# Altium PCB PCB1.PcbDoc (part 2 of 2)
Units mm, origin at the board's own origin, x right, y up, seen from the top; angles counter-clockwise.
Board outline 99 x 99 mm, 4 copper layers (TOP, GND, P, BOT), stack 1.591 mm thick; 114 components, 75 nets, 421 pads, 154 vias.
Unrouted connection lines stored in the file: 105.
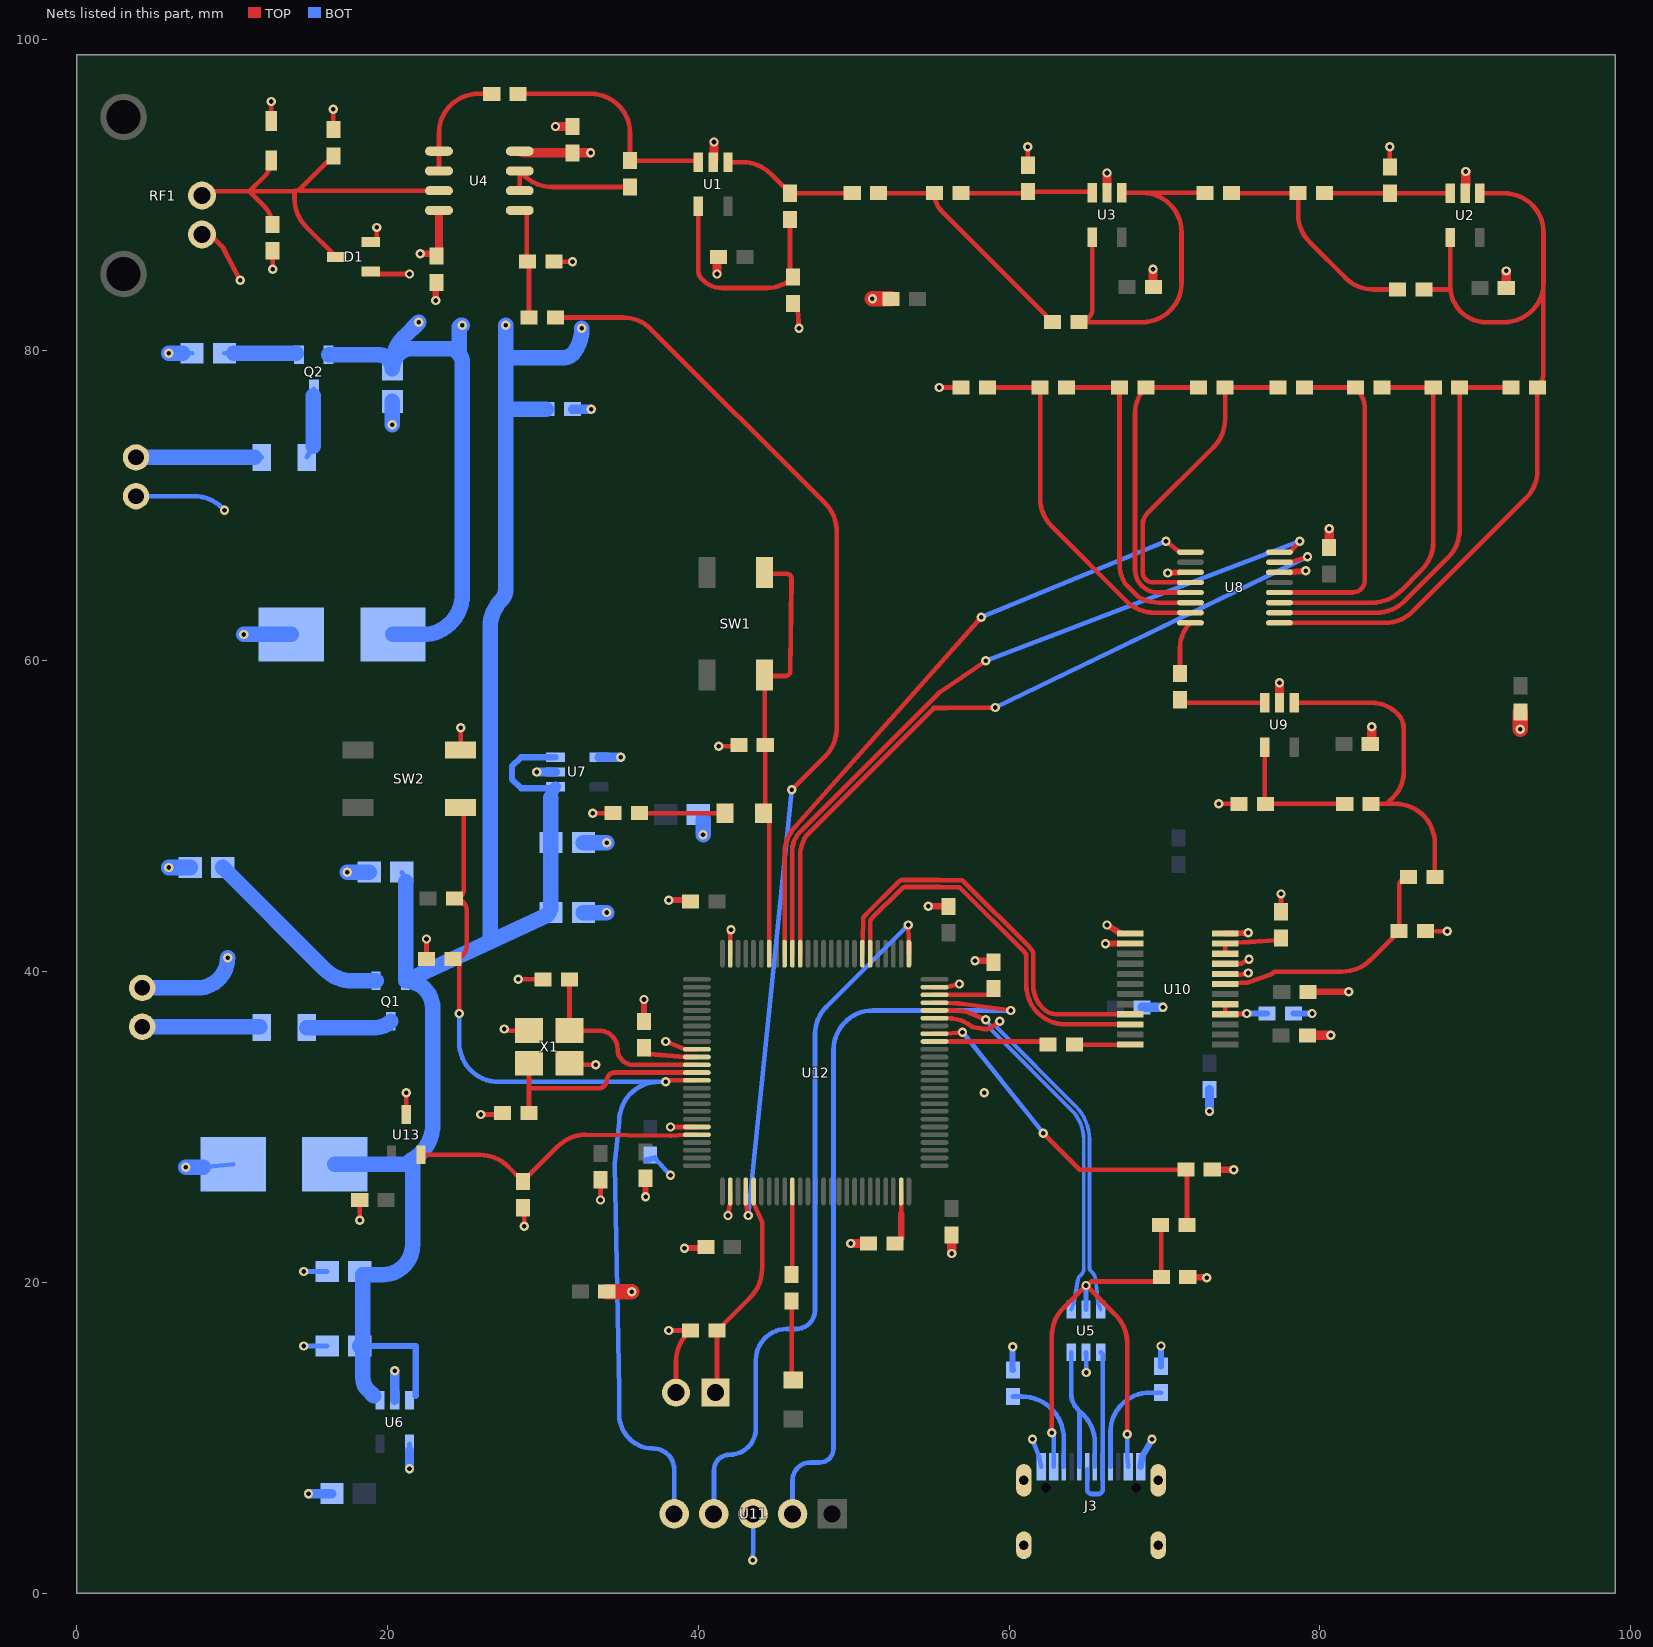
[diagram p4: the nets of this part, all layers, seen from the top]

## Via types
v1: diameter 0.6, hole 0.3, TOP to BOT, tented both sides, 137 vias
v2: diameter 1, hole 0.5, TOP to BOT, tented both sides, 9 vias
v3: diameter 0.6, hole 0.3, TOP to BOT, 8 vias

## Nets (pads, with @x,y where several pads share a name; then routed paths per layer and width w, separated by ;. In a path a pad name is that pad's centre, name@x,y a point inside that pad or via, vN(x,y) a via of type N, cw(c..) or ccw(c..) an arc to the next point about the centre after c; other vN are vias at no path point) (continued)
ADC_D6: U10.9 U12.82 | length 25.7
  TOP w0.3: U12.82@50.55,41.15 50.601,43.232 cw(c53.59,43.16) 50.609,43.394 50.609,43.395 cw(c50.908,43.37) 50.678,43.562 cw(c51.59,42.798) 50.679,43.564 cw(c50.908,43.37) 50.692,43.578 50.81,43.7 cw(c51.35,43.18) 50.818,43.708 ; 50.818,43.709 52.826,45.716 cw(c53.355,45.186) 52.827,45.718 52.923,45.813 cw(c53.134,45.6) 53.134,45.9 53.32,45.9 55.518,45.9 55.538,45.9 55.541,45.9 56.884,45.878 56.886,45.878 cw(c56.879,45.578) 57.09,45.791 57.219,45.663 cw(c56.69,45.131) 57.22,45.661 61.256,41.625 cw(c60.726,41.095) 61.258,41.624 61.28,41.601 cw(c61.068,41.39) 61.3,41.579 61.302,41.577 61.386,41.471 61.49,41.34 cw(c61.255,41.154) 61.555,41.156 ; 61.555,41.155 61.561,38.941 ccw(c61.861,38.942) 61.563,38.91 ccw(c63.64,39.14) 61.563,38.907 ccw(c63.64,39.14) 62.497,37.39 ccw(c62.66,37.642) 62.55,37.363 ccw(c63.15,38.9) 63.15,37.25 U10.9@67.804,37.25
ADC_D7: U10.10 U12.81 | length 25
  TOP w0.3: U12.81@51.05,41.15 51.05,43.16 cw(c53.59,43.16) 51.05,43.183 51.05,43.185 cw(c51.35,43.18) 51.139,43.393 53.108,45.362 cw(c53.32,45.15) 53.32,45.45 55.517,45.45 cw(c55.517,45.15) 55.519,45.45 55.521,45.45 56.695,45.431 56.697,45.431 cw(c56.689,45.131) 56.902,45.343 60.939,41.306 cw(c60.726,41.094) 60.959,41.284 60.961,41.282 61.035,41.189 cw(c60.8,41.002) 61.1,41.005 ; 61.1,41.003 61.1,39.14 ccw(c63.64,39.14) 63.64,36.6 U10.10@67.804,36.6
CLK: R45.2 U10.12 | length 3.6
  TOP w0.3: R45.2@64.2,35.3 U10.12@67.804,35.3
DAC_OUT: R10.2 U12.29 | length 71
  TOP w0.3: R10.2@30.8,82.1 35.148,82.1 cw(c35.148,79.56) 36.944,81.356 48.156,70.144 cw(c46.36,68.348) 48.9,68.348 48.9,55.652 cw(c46.36,55.652) 48.156,53.856 v1(46,51.7) ; U12.29@43.05,25.85 43.05,25.1 v1(43.2,24.3)
  BOT w0.3: v1(43.2,24.3) v1(46,51.7)
function: H1.1 R103.1 U12.30 | length 14.2
  TOP w0.3: H1.1@41.1,12.9 ccw(c40.859,13.141) 41.2,13.141 R103.1@41.2,16.9 43.356,19.056 ccw(c41.56,20.852) 44.1,20.852 44.1,23.9 43.55,25.1 U12.30@43.55,25.85
GND: C1.2 C2.2 C3.2 C4.2 C5.2 C6.1 C7.1 C8.1 C11.2 C12.1 C13.1 C15.2 C17.1 C22.1 C23.1 C25.1 C26.2 C27.2 C28.2 C29.1 C30.1 C31.1 C32.2 C33.1 C35.1 C36.1 C37.1 C38.1 C39.1 C40.1 C41.1 C42.1 C43.1 C44.1 C45.1 C46.2 C47.1 C48.2 C49.1 C106.2 C107.2 C108.1 CP3.1 CP4.1 CP5.1 CP6.1 CP7.2 CP10.1 D2.2 H1.2 J1.2 J2.1 J3.A1_B12 J3.B1_A12 J3.SH1 J3.SH2 J3.SH3 J3.SH4 R1.1 R9.2 R11.2 R13.1 R24.1 R25.1 R26.1 R40.2 R100.1 R102.2 R103.2 R108.2 RF1.2 SW2.3 U1.2 U2.2 U3.2 U5.2 U6.2 U6.4 U7.2 U7.4 U8.3 U8.14 U9.2 U10.1 U10.2 U10.20 U10.21 U10.24 U11.3 U12.10 U12.20 U12.27 U12.74 U12.99 U13.3 X1.2 X1.4 | length 150.8
  TOP w0.3: RF1.2@8.35,87.675 9.331,86.694 ; 9.332,86.693 cw(c9.119,86.482) 9.384,86.622 v1(10.5,84.5) ; D2.2@12.5,94.75 12.5,95.25 v1(12.5,96) ; v1(12.6,85.2) C8.1@12.6,86.2 ; R100.1@16.5,94.2 v1(16.5,95.5) ; v1(18.2,24) C44.1@18.2,25.3 ; U13.3@21.2,30.8 v1(21.2,32.2) ; C39.1@22.5,40.8 v1(22.5,42.1) ; C11.2@23.1,83.95 C11.2@23.15,84.35 ; SW2.3@24.65,54.275 ccw(c24.65,54.325) 24.7,54.325 v1(24.7,55.7) ; v1(26,30.8) 27,30.8 C36.1@27.4,30.9 ; v1(27.5,36.3) ccw(c27.6,36.3) 27.6,36.2 X1.2@29.1,36.2 ; v1(28.4,39.5) C37.1@30,39.5 ; C41.1@28.7,24.8 cw(c28.459,24.559) 28.8,24.559 v1(28.8,23.6) ; C13.1@30.7,85.7 v1(31.9,85.7) ; C6.1@31.6,94.4 C6.1@31.9,94.4 ; X1.4@31.7,34.1 ccw(c31.8,34.1) 31.8,34 v1(33.4,34) ; v1(33.2,50.2) R102.2@34.5,50.2 ; v1(33.7,25.3) C43.1@33.7,26.6 ; v1(37.9,35.5) 39.15,35 U12.10@39.9,35 ; v1(38.1,16.9) R103.2@39.5,16.9 39.304,16.704 ccw(c41.1,14.908) 38.56,14.908 H1.2@38.56,12.9 ; v1(38.2,30) U12.20@39.9,30 ; C35.1@39.1,44.6 C35.1@39.5,44.5 ; U1.2@40.95,92.1 ccw(c40.83,92.22) U1.2@41,92.22 ; C1.2@41.2,85.759 cw(c41.541,85.759) C1.2@41.3,86 ; v1(41.3,54.5) 42.2,54.5 R40.2@42.6,54.6 ; v1(41.9,24.3) 42.05,25.1 U12.27@42.05,25.85 ; U12.99@42.05,41.15 v1@42.05,42.508 ; R1.1@46.1,83 46.4,82.6 v1(46.475,81.4) ; U12.74@55.2,39 55.95,39 v1(56.8,39.2) ; v1(55.5,77.6) R24.1@56.9,77.6 ; C46.2@58.7,40.7 C46.2@59,40.6 ; C7.1@61.2,91.9 v1(61.2,93.1) ; U3.2@66.3,90.125 U3.2@66.3,90.6 ; U10.2@67.104,41.8 U10.2@67.804,41.8 U10.2@67.551,41.85 ; C4.2@69.262,84.35 C4.2@69.287,84.05 ; U8.3@70.974,65.7 U8.3@71.668,65.7 ; v1(73.5,50.8) R25.1@74.8,50.8 ; U10.20@73.9,39.85 74.6,39.8 74.847,39.8 ccw(c74.847,40.1) 74.911,39.807 v1(75.397,39.913) ; U10.21@73.9,40.5 74.805,40.5 ccw(c74.804,40.9) 75.003,40.553 v1(75.437,40.8) ; U8.14@77.4,65.7 U8.14@78.094,65.7 ; v1(77.5,45) 77.5,44.25 77.698,44.019 C33.1@77.8,43.9 ; C26.2@83.241,54.659 ccw(c83,54.9) C26.2@83.341,54.9 ; C5.2@84.5,91.8 v1(84.5,93.1) ; 87.5,42.6 v1(88.2,42.6) ; U2.2@89.365,90.274 U2.2@89.4,90.575
  TOP w0.4: v1(23.1,83.2) C11.2@23.1,83.95 ; C38.1@36.5,36.8 v1(36.5,38.2) ; v1(36.6,25.5) C42.1@36.6,26.7 ; v1(38.1,44.6) C35.1@39.1,44.6 ; v1(39.1,22.2) 40.129,22.2 C47.1@40.479,22.279 ; v1@42.05,42.508 cw(c42.45,42.506) v1(42.1,42.7) ; v1(54.8,44.2) C45.1@56.1,44.2 ; v1(57.8,40.7) C46.2@58.7,40.7 ; v1(66.2,41.8) U10.2@67.104,41.8 ; v1(66.3,43) U10.1@67.104,42.498 ; v1(70.209,65.658) U8.3@70.974,65.7 ; C12.1@71.5,20.35 71.525,20.325 72.7,20.325 v3(72.725,20.3) ; R13.1@73.075,27.25 v3(74.45,27.25) ; U10.24@73.9,42.45 74.55,42.45 v1(75.4,42.5) ; U8.14@78.094,65.7 v1(79.1,65.8) ; C31.1@79.25,38.7 79.6,38.7 v1(81.85,38.7)
  TOP w0.6: v1(30.8,94.4) C6.1@31.6,94.4 ; U1.2@41,92.22 v1(41,93.4) ; v1(41.2,84.9) C1.2@41.2,85.759 ; v1(49.8,22.5) C48.2@50.95,22.5 ; v1(56.3,21.85) C49.1@56.3,23.05 ; U3.2@66.3,90.6 v1(66.3,91.4) ; C4.2@69.262,84.35 v1(69.262,85.2) ; U9.2@77.4,57.3 v1(77.4,58.6) ; C28.2@79.2,35.9 v1(80.7,35.9) ; C25.1@80.6,67.5 v1(80.6,68.5) ; C26.2@83.341,54.9 v1(83.341,55.759) ; U2.2@89.4,90.575 v1(89.4,91.5) ; C3.2@92,84 v1(92,85.1)
  TOP w1: C108.1@34.1,19.4 v1(35.7,19.4) ; v1(51.2,83.3) C2.2@52.4,83.3 ; v1(92.9,55.6) C107.2@92.9,56.7
  BOT w0.3: J2.1@3.8,70.6 7.548,70.6 cw(c7.548,68.06) 9.344,69.856 v1(9.5,69.7) ; R26.1@6.81,79.787 R26.1@7.41,79.8 ; C15.2@8.116,27.4 C15.2@10.066,27.6 ; v1(14.6,15.9) CP4.1@16.11,15.9 ; v1(14.6,20.7) CP3.1@16.11,20.7 ; U6.4@21.4,9.15 U6.4@21.4,9.6 ; C40.1@37.2,28 v1(38.2,26.9) ; CP10.1@39.99,50.1 cw(c39.99,49.79) CP10.1@40.3,49.79 ; v1(43.5,2.1) 43.52,2.993 ccw(c43.22,3) 43.52,3 U11.3@43.52,5.1 ; v3(61.5,9.9) 61.92,8.795 J3.B1_A12@62.07,8.13 ; U5.2@64.95,15.5 64.96,15.075 v1(64.96,14.2)
  BOT w0.4: C40.1@36.65,27.85 36.972,27.938 C40.1@37.2,28 ; v1(60.225,15.85) 60.225,14.41 ccw(c60.31,14.41) R11.2@60.25,14.35 ; J3.A1_B12@68.47,8.13 68.57,8.805 v3(69.2,9.9) ; R108.2@69.775,14.6 v3(69.775,15.9) ; C30.1@78.3,37.3 v1(79.5,37.3)
  BOT w0.6: v1(14.9,6.4) CP5.1@16.41,6.4 ; U6.2@20.45,12.4 v1(20.45,14.3) ; v1(21.4,8) U6.4@21.4,9.15 ; v1(29.6,52.85) U7.2@30.8,52.85 ; C106.2@31.9,76.2 v1(33.1,76.2) ; U7.4@33.6,53.8 v1@35,53.8 ; C29.1@68.55,37.7 v1(69.9,37.7) ; v1(72.9,31) C27.2@72.9,32.4
  BOT w1: J1.2@4.2,38.95 7.75,38.95 ccw(c7.75,40.9) v1(9.7,40.9) ; v1(5.9,46.7) R9.2@7.3,46.7 ; v1(5.9,79.8) R26.1@6.81,79.787 ; v1(7,27.4) C15.2@8.116,27.4 ; v1(10.734,61.7) C17.1@13.8,61.7 ; v1(17.4,46.4) CP6.1@18.81,46.4 ; v1(20.3,75.2) CP7.2@20.3,76.7 ; C23.1@32.6,43.8 v1(34.1,43.8) ; C22.1@32.6,48.3 v1(34.1,48.3) ; v1(40.3,48.8) CP10.1@40.3,49.79
  other v1: 58.4,32.2 35,53.8
MUX_A0: U8.1 U12.92 | length 41.1
  TOP w0.3: U12.92@45.55,41.15 45.55,47.598 cw(c48.09,47.598) 46.288,49.388 46.289,49.389 ccw(c46.075,49.6) 46.299,49.399 v1(58.2,62.8) ; v1(70.1,67.7) 70.974,67 U8.1@71.668,67
  BOT w0.3: v1(58.2,62.8) v1(70.1,67.7)
MUX_A1: U8.16 U12.91 | length 47.5
  TOP w0.3: U12.91@46.05,41.15 46.05,47.998 cw(c48.59,47.998) 46.05,48.022 cw(c46.35,48.018) 46.058,48.087 cw(c48.09,47.598) 46.613,49.077 55.428,57.892 cw(c55.64,57.679) 55.471,57.927 v1(58.5,60) ; U8.16@77.4,67 78.094,67 v1(78.7,67.7)
  BOT w0.3: v1(58.5,60) v1(78.7,67.7)
MUX_A2: U8.15 U12.90 | length 47.4
  TOP w0.3: U12.90@46.55,41.15 46.55,47.398 cw(c49.09,47.398) 46.953,48.771 cw(c47.205,48.608) 46.992,48.819 55.136,56.964 56.01,56.964 ccw(c56.01,57.264) 56.014,56.964 v1(59.1,57) ; U8.15@77.4,66.35 78.094,66.35 v1(79.2,66.7)
  BOT w0.3: v1(59.1,57) v1(79.2,66.7)
NetC5_1: C5.1 R5.1 U2.3 | length 8.1
  TOP w0.3: R5.1@80.3,90.1 C5.1@84.5,90.1 U2.3@88.4,90.1
NetC7_2: C7.2 R7.1 U3.3 | length 8.5
  TOP w0.3: R7.1@56.9,90.1 60.959,90.1 ccw(c60.959,90.441) C7.2@61.2,90.2 65.169,90.2 cw(c65.169,89.944) U3.3@65.35,90.125
NetC8_2: C8.2 D1.3 D2.1 R100.2 RF1.1 U4.3 | length 29
  TOP w0.2: RF1.1@8.35,90.175 RF1.1@8.395,90.22
  TOP w0.3: RF1.1@8.395,90.22 11.1,90.22 ; D2.1@12.5,92.2 cw(c11.1,92.2) 12.09,91.21 11.1,90.22 ; C8.2@12.6,87.9 ccw(c10.62,87.9) 12.02,89.3 11.1,90.22 ; 14.376,90.265 U4.3@23.7,90.265 ; R100.2@16.5,92.5 14.376,90.376 cw(c14.109,90.642) 14.109,90.265 ccw(c14.109,90.111) 14,90.22 ; D1.3@16.7,86 14.744,87.956 cw(c16.54,89.752) 14,89.752 14,90.22 ; 11.1,90.22 14,90.22
NetC9_1: C9.1 R17.2 U2.1 U2.4 U8.9 | length 55.5
  TOP w0.3: U8.9@77.4,62.45 84.198,62.45 ccw(c84.198,64.99) 85.994,63.194 93.256,70.456 ccw(c91.46,72.252) 94,72.252 R17.2@94,77.6 ccw(c93.062,78.538) 94.389,78.538 94.389,84.1 ; C9.1@86.7,83.9 88.24,83.9 cw(c88.24,83.706) 88.434,83.706 ; U2.4@88.4,87.25 88.4,84.1 ccw(c90.7,84.1) 90.7,81.8 91.86,81.8 ccw(c91.86,84.34) 94.4,84.34 94.4,87.56 ccw(c91.86,87.56) 91.86,90.1 U2.1@90.3,90.1
NetC9_2: C9.2 R4.1 R5.2 | length 14.5
  TOP w0.3: R4.1@74.3,90.1 R5.2@78.6,90.1 78.6,88.752 ccw(c81.14,88.752) 79.344,86.956 81.656,84.644 ccw(c83.452,86.44) 83.452,83.9 C9.2@85,83.9
NetC10_1: C10.1 R4.2 U3.1 U3.4 | length 26.6
  TOP w0.3: U3.4@65.35,87.275 65.35,82.65 cw(c64.5,82.65) C10.1@64.5,81.8 68.56,81.8 ccw(c68.56,84.34) 71.1,84.34 71.1,87.585 ccw(c68.56,87.585) 68.56,90.125 ; U3.1@67.25,90.125 72.54,90.125 cw(c72.54,90.04) R4.2@72.6,90.1
NetC10_2: C10.2 R6.1 R7.2 | length 15
  TOP w0.3: R6.1@51.6,90.1 R7.2@55.2,90.1 ccw(c56.89,90.1) 55.695,88.905 C10.2@62.8,81.8
NetC12_2: C12.2 J3.A4_B9 J3.B4_A9 R12.1 U5.5 | length 35.1
  TOP w0.3: v3(62.75,10.325) 62.75,16.548 cw(c65.29,16.548) 63.494,18.344 v3(64.95,19.8) ; v3(67.6,10.225) 67.6,16.098 ccw(c65.06,16.098) 66.856,17.894 v3(64.95,19.8) ; R12.1@69.75,23.675 69.8,23.625 C12.2@69.8,20.35 69.5,20.05 65.281,20.05 65.031,19.8 v3(64.95,19.8)
  BOT w0.3: v3(62.75,10.325) 62.777,10.298 cw(c62.566,10.085) 62.866,10.086 62.868,8.855 J3.B4_A9@62.87,8.13 ; U5.5@64.95,18.25 v3(64.95,19.8) ; v3(67.6,10.225) 67.6,8.855 J3.A4_B9@67.67,8.13
NetC13_2: C13.2 R10.1 U4.5 | length 7.4
  TOP w0.3: U4.5@28.5,88.995 28.954,88.995 28.954,86 C13.2@29,85.7 29.092,85.4 29.092,82.4 R10.1@29.1,82.1
NetC30_2: C30.2 U10.16 U10.17 | length 3.4
  TOP w0.3: U10.17@73.9,37.9 U10.16@73.9,37.25 73.925,37.275 75.275,37.275 v1(75.3,37.3)
  BOT w0.4: v1(75.3,37.3) C30.2@76.6,37.3
NetC32_1: C32.1 R37.2 U10.19 | length 16.2
  TOP w0.3: U10.19@73.9,39.2 74.6,39.25 74.836,39.284 cw(c74.879,38.987) 74.879,39.287 75.309,39.287 ccw(c75.309,39.587) 75.409,39.305 76.8,39.8 ccw(c76.698,40.082) 76.893,39.854 cw(c77.41,39.253) 77.077,39.973 cw(c77.202,39.7) 77.202,40 81.448,40 ccw(c81.448,42.54) 83.244,40.744 C32.1@85.1,42.6 85.1,45.5 cw(c85.7,45.5) R37.2@85.7,46.1
NetC33_2: C33.2 U10.22 U10.23 | length 4.3
  TOP w0.3: U10.22@73.9,41.15 U10.23@73.9,41.8 74.6,41.85 75.437,41.901 ccw(c75.4,42.5) 75.441,41.901 77.2,42.022 C33.2@77.556,42.046
NetC36_2: C36.2 U12.13 X1.3 | length 14.6
  TOP w0.3: C36.2@29.1,30.9 X1.3@29.1,34.1 ; 29.1,32.5 33.6,32.5 ccw(c33.6,33) 34.1,33 cw(c34.6,33) 34.6,33.5 U12.13@39.9,33.5
NetC37_2: C37.2 U12.12 X1.1 | length 12.8
  TOP w0.3: C37.2@31.7,39.5 X1.1@31.7,36.2 33.6,36.2 cw(c33.6,35) 34.8,35 ccw(c35.8,35) 35.8,34 U12.12@39.9,34
NetC38_2: C38.2 U12.11 | length 3.6
  TOP w0.3: C38.2@36.5,35.1 36.8,34.7 39.15,34.5 U12.11@39.9,34.5
NetC41_2: C41.2 U12.21 U13.2 | length 19.5
  TOP w0.3: U13.2@22.15,28.2 25.948,28.2 cw(c25.948,25.66) 27.744,27.456 C41.2@28.7,26.5 30.956,28.756 cw(c32.752,26.96) 32.752,29.5 cw(c32.752,29.2) 32.756,29.5 38.192,29.423 ccw(c38.2,30) 38.248,29.425 39.15,29.5 U12.21@39.9,29.5
NetC46_1: C46.1 U12.73 | length 3.5
  TOP w0.3: U12.73@55.2,38.5 55.95,38.5 C46.1@58.7,38.5
NetC48_1: C48.1 U12.49 | length 3.6
  TOP w0.3: C48.1@52.65,22.5 C48.1@53.05,22.8 ; 53.05,24.4 53.05,25.1 U12.49@53.05,25.85
  TOP w0.4: C48.1@53.05,22.8 53.05,24.4
NetD3_1: D3.1 R46.2 | length 5.1
  TOP w0.3: R46.2@46,18.8 46,13.941 ccw(c46.341,13.941) D3.1@46.1,13.7
NetD4_1: D4.1 R102.1 | length 5.5
  TOP w0.3: R102.1@36.2,50.2 D4.1@41.7,50.2
NetD4_2: D4.2 R40.1 SW1.1 SW1.2 U12.94 | length 27.8
  TOP w0.3: SW1.1@44.275,65.65 44.625,65.6 45.695,65.6 cw(c45.695,65.3) 45.995,65.295 45.905,59.324 ; U12.94@44.55,41.15 44.55,49.725 D4.2@44.2,50.2 44.293,50.675 44.293,54.3 R40.1@44.3,54.6 44.278,54.9 44.278,58.55 44.275,59.15 44.625,59.029 45.605,59.029 ccw(c45.605,59.329) 45.905,59.323
NetF1_1: F1.1 J1.1 | length 7.7
  BOT w0.3: F1.1@11.779,36.45 cw(c11.779,36.279) F1.1@11.9,36.4
  BOT w1: J1.1@4.2,36.45 F1.1@11.779,36.45
NetF1_2: F1.2 Q1.3 | length 5.5
  BOT w1: F1.2@14.79,36.4 19.234,36.4 ccw(c19.234,37.766) Q1.3@20.2,36.8
NetF2_1: F2.1 J2.2 | length 8.1
  BOT w0.3: F2.1@11.455,73.1 F2.1@11.9,73.1
  BOT w1: J2.2@3.8,73.1 F2.1@11.455,73.1
NetF2_2: F2.2 Q2.3 | length 4.5
  BOT w0.3: F2.2@14.79,73.1 F2.2@15.203,73.814 ; Q2.3@15.203,77.05 Q2.3@15.25,77.5
  BOT w1: F2.2@15.203,73.814 Q2.3@15.203,77.05
NetJ3_A5: J3.A5 R108.1 | length 6.9
  BOT w0.3: J3.A5@66.52,8.13 66.52,10.355 cw(c69.065,10.355) 69.065,12.9 R108.1@69.775,12.9
NetJ3_A6: J3.A6 J3.B6 U5.3 | length 11.3
  BOT w0.3: U5.3@64,15.5 64,12.815 ccw(c65.365,12.815) 64.4,11.85 cw(c64.098,11.548) 64.525,11.548 J3.B6@64.525,8.136 ; 64.606,11.628 cw(c62.994,9.684) 65.52,9.684 J3.A6@65.52,8.13
NetJ3_A7: J3.A7 J3.B7 U5.1 | length 11.5
  BOT w0.3: J3.A7@65.025,7.975 65.025,6.675 ccw(c65.325,6.675) 65.325,6.375 65.725,6.375 ccw(c65.725,6.675) 66.025,6.675 66.025,15.375 U5.1@65.9,15.5
NetJ3_B5: J3.B5 R11.1 | length 6.6
  BOT w0.3: R11.1@60.25,12.65 60.81,12.65 cw(c60.81,9.94) 63.52,9.94 J3.B5@63.52,8.13
NetQ1_1: Q1.1 R9.1 | length 12.8
  BOT w1: R9.1@9.39,46.7 15.946,40.144 ccw(c17.742,41.94) 17.742,39.4 Q1.1@19.25,39.4
NetQ2_1: Q2.1 R26.2 | length 4.8
  BOT w0.3: R26.2@9.5,79.8 R26.2@10.1,79.787 ; Q2.1@14.125,79.787 Q2.1@14.3,79.7
  BOT w1: R26.2@10.1,79.787 Q2.1@14.125,79.787
NetR1_2: R1.2 R2.1 U1.4 | length 14.7
  TOP w0.3: U1.4@40,89.25 40,85.083 ccw(c40.683,85.083) 40.2,84.6 40.305,84.495 ccw(c41.5,85.69) 41.5,84 44.41,84 ccw(c44.41,86.39) R1.2@46.1,84.7 cw(c46.583,85.183) 45.9,85.183 R2.1@45.9,88.4
NetR2_2: R2.2 R6.2 U1.1 | length 8.7
  TOP w0.3: U1.1@41.9,92.1 42.848,92.1 cw(c42.848,89.56) 44.644,91.356 R2.2@45.9,90.1 R6.2@49.9,90.1
NetR3_1: R3.1 U4.1 U4.2 | length 7.3
  TOP w0.3: U4.2@23.3,91.535 U4.1@23.3,92.805 23.3,93.96 cw(c25.84,93.96) 25.84,96.5 R3.1@26.7,96.5
NetR3_2: R3.2 R8.2 U1.3 | length 14.8
  TOP w0.3: R3.2@28.4,96.5 33.06,96.5 cw(c33.06,93.96) 35.6,93.96 R8.2@35.6,92.2 39.759,92.2 cw(c39.759,91.859) U1.3@40,92.1
NetR8_1: R8.1 U4.6 U4.7 | length 8.7
  TOP w0.3: U4.6@28.5,90.265 U4.7@28.5,91.535 28.791,91.244 ccw(c30.587,93.04) 30.587,90.5 R8.1@35.6,90.5
NetR17_1: R17.1 R18.2 U8.10 | length 26.7
  TOP w0.3: U8.10@77.4,63.1 83.648,63.1 ccw(c83.648,65.64) 85.444,63.844 88.256,66.656 ccw(c86.46,68.452) 89,68.452 R18.2@89,77.6 R17.1@92.3,77.6
NetR18_1: R18.1 R19.2 U8.11 | length 25.4
  TOP w0.3: U8.11@77.4,63.75 83.398,63.75 ccw(c83.398,66.29) 85.194,64.494 86.556,65.856 ccw(c84.76,67.652) 87.3,67.652 R18.1@87.3,77.6 R19.2@84,77.6 R19.2@83.8,77.6
NetR19_1: R19.1 R20.2 U8.12 | length 21.8
  TOP w0.3: U8.12@77.4,64.4 82.1,64.4 ccw(c82.1,65.2) 82.9,65.2 82.9,76.151 ccw(c80.851,76.151) R19.1@82.3,77.6 R20.2@79,77.6
NetR20_1: R20.1 R21.2 U8.4 | length 20.8
  TOP w0.3: U8.4@71.668,65.05 69.25,65.05 cw(c69.25,65.7) 68.754,65.28 cw(c69.25,65.7) 68.752,65.282 cw(c68.983,65.474) 68.737,65.302 cw(c69.6,65.9) 68.735,65.305 cw(c68.983,65.474) 68.722,65.325 68.659,65.435 cw(c68.92,65.584) 68.648,65.456 cw(c69.6,65.9) 68.647,65.46 cw(c68.92,65.584) 68.637,65.483 68.637,65.485 cw(c69.25,65.7) 68.6,65.7 68.6,68.776 cw(c69.624,68.776) 68.9,69.5 73.156,73.756 ccw(c71.36,75.552) 73.9,75.552 R21.2@73.9,77.6 R20.1@77.3,77.6
NetR21_1: R21.1 R22.2 U8.5 | length 19.7
  TOP w0.3: U8.5@71.668,64.4 69.6,64.4 cw(c69.6,65.9) 68.1,65.9 68.1,75.91 cw(c70.49,75.91) R22.2@68.8,77.6 R21.1@72.2,77.6
NetR22_1: R22.1 R23.2 U8.6 | length 20.7
  TOP w0.3: R23.2@63.7,77.6 R22.1@67.1,77.6 67.1,66.29 ccw(c69.64,66.29) 67.455,64.995 ccw(c67.713,65.147) 67.457,64.992 ccw(c67.713,65.147) 67.5,64.937 68.287,64.15 ccw(c68.498,64.363) 68.343,64.106 ccw(c68.498,64.363) 68.345,64.105 ccw(c69.64,66.29) 69.64,63.75 U8.6@71.668,63.75
NetR23_1: R23.1 R24.2 U8.7 | length 23.7
  TOP w0.3: R24.2@58.6,77.6 R23.1@62,77.6 62,70.452 ccw(c64.54,70.452) 62.744,68.656 67.556,63.844 ccw(c69.352,65.64) 69.352,63.1 U8.7@71.668,63.1
NetR25_2: R25.2 R101.1 U9.4 | length 8.7
  TOP w0.3: U9.4@76.45,54.45 76.45,50.921 ccw(c76.742,51.214) 76.742,50.8 R101.1@81.6,50.8
NetR27_1: R27.1 U9.3 | length 5.5
  TOP w0.3: R27.1@71,57.5 ccw(c71.483,57.983) 71.483,57.3 U9.3@76.45,57.3
NetR27_2: R27.2 U8.8 | length 3.4
  TOP w0.3: R27.2@71,59.2 71,60.836 cw(c73.282,60.836) U8.8@71.668,62.45
NetR37_1: R37.1 R101.2 U9.1 | length 20.7
  TOP w0.3: U9.1@78.35,57.3 83.31,57.3 cw(c83.31,54.91) 85,56.6 cw(c84.034,55.634) 85.4,55.634 85.4,52.8 cw(c83.227,52.8) 84.764,51.264 84.4,50.9 ; R101.2@83.3,50.8 84.86,50.8 cw(c84.86,48.26) 87.4,48.26 R37.1@87.4,46.1
NetR45_1: R45.1 U12.67 | length 7.3
  TOP w0.3: U12.67@55.2,35.5 62.1,35.5 R45.1@62.5,35.3
NetR46_1: R46.1 U12.35 | length 5.4
  TOP w0.3: R46.1@46,20.5 ccw(c45.88,20.62) 46.05,20.62 U12.35@46.05,25.85
NRST: C39.2 R41.2 SW2.1 U11.5 U12.14 | length 64.9
  TOP w0.3: v1(24.6,37.3) 24.6,40.4 ccw(c24.2,40.4) C39.2@24.2,40.8 ccw(c24.2,41.7) 25.1,41.7 25.1,43.9 ccw(c24.3,43.9) R41.2@24.3,44.7 ccw(c24.3,45.3) 24.9,45.3 24.9,49.1 24.9,50.275 ccw(c24.65,50.275) SW2.1@24.65,50.525 ; v1(37.9,32.9) cw(c38,32.9) 38,33 U12.14@39.9,33
  BOT w0.3: v1(24.6,37.3) 24.6,35.44 ccw(c27.14,35.44) 27.14,32.9 37.44,32.9 ; v1(37.9,32.9) 37.44,32.9 ; U11.5@38.44,5.1 38.44,7.96 ccw(c37.1,7.96) 37.1,9.3 cw(c37.1,11.5) 34.9,11.5 34.9,13.006 34.623,27.589 cw(c35.2,27.6) 34.626,27.659 34.898,30.33 ccw(c34.6,30.36) 34.9,30.36 cw(c37.44,30.36) 37.44,32.9
SWCLK: U11.4 U12.76 | length 46.1
  TOP w0.3: v1(53.5,43) 53.55,41.9 U12.76@53.55,41.15
  BOT w0.3: U11.4@40.98,5.1 ccw(c40.98,5.12) 41,5.12 41,7.9 cw(c42,7.9) 42,8.9 ccw(c42,10.6) 43.7,10.6 43.7,15 cw(c45.7,15) 45.7,17 46.3,17 ccw(c46.3,18.2) 47.5,18.2 47.5,35.948 cw(c50.04,35.948) 48.244,37.744 v1(53.5,43)
SWDIO: U11.2 U12.72 | length 49.4
  TOP w0.3: U12.72@55.2,38 55.95,38 56.76,37.942 cw(c56.548,34.96) 56.946,37.923 v1(60.1,37.5)
  BOT w0.3: U11.2@46.06,5.1 46.06,7.26 cw(c47.2,7.26) 47.2,8.4 47.8,8.4 ccw(c47.8,9.3) 48.7,9.3 48.7,34.96 cw(c51.24,34.96) 51.24,37.5 v1(60.1,37.5)
USB_DM: U5.6 U12.70 | length 25.6
  TOP w0.3: U12.70@55.2,37 56.048,37 cw(c56.048,34.46) 57.591,36.478 ccw(c57.774,36.716) 57.593,36.476 ccw(c57.774,36.716) 57.725,36.42 58.403,36.308 ccw(c58.5,36.9) 58.845,36.409 v1(59.4,36.8)
  BOT w0.24: v1(59.4,36.8) 59.223,36.623 ccw(c59.336,36.51) 59.176,36.51 ccw(c59.336,36.51) 59.223,36.397 64.281,31.339 cw(c62.226,29.282) 64.286,31.334 cw(c62.145,29.2) 65.167,29.2 65.167,20.92 ccw(c65.408,20.921) 65.255,20.735 ; 65.256,20.735 cw(c64.715,20.07) 65.567,20.16 ; 65.567,20.158 65.72,18.705 U5.6@65.9,18.25
USB_DP: U5.4 U12.71 | length 24.7
  TOP w0.3: U12.71@55.2,37.5 56.548,37.5 cw(c56.548,34.96) 57.644,37.251 cw(c56.548,34.96) 57.646,37.25 ccw(c57.774,37.522) 57.66,37.244 v1(58.5,36.9)
  BOT w0.24: v1(58.5,36.9) ccw(c58.631,36.9) 58.538,36.807 58.722,36.624 cw(c58.512,36.414) 58.808,36.414 ccw(c59.105,36.414) 58.895,36.205 64.022,31.078 cw(c62.145,29.2) 64.8,29.2 64.8,20.8 cw(c64.56,20.802) 64.793,20.743 cw(c64.56,20.802) 64.778,20.701 cw(c64.011,21.055) 64.563,20.415 ; U5.4@64,18.25 64.18,18.705 64.438,20.196 cw(c64.802,20.134) 64.562,20.415
VBAT+: C6.2 C15.1 C22.2 C23.2 C106.1 CP3.2 CP4.2 CP6.2 D1.2 Q1.2 U4.8 U6.1 U6.3 U7.1 U7.3 | length 129.4
  TOP w0.3: D1.2@19.2,86.95 19.3,87.125 v1(19.3,87.9)
  TOP w0.6: U4.8@28.5,92.805 ccw(c28.839,93.3) 28.837,92.7 v1(33.06,92.7)
  BOT w0.3: CP6.2@20.9,46.4 cw(c20.297,45.797) CP6.2@21.15,45.797
  BOT w0.4: CP4.2@18.2,15.9 21.8,15.9 21.8,12.7 ; U7.1@30.8,51.9 30.7,51.8 28.586,51.8 28,52.386 28,53.214 28.586,53.8 U7.3@30.8,53.8
  BOT w0.7: 30.51,51.2 U7.1@30.8,51.9
  BOT w1: C15.1@16.6,27.6 21.6,27.6 21.6,22.4 cw(c19.7,22.4) 19.7,20.5 18.4,20.5 CP4.2@18.4,15.9 ; CP4.2@18.2,15.9 CP4.2@18.4,15.9 ; 19.1,12.7 18.692,13.108 cw(c19.4,13.814) 18.4,13.814 CP4.2@18.4,15.9 ; CP6.2@21.15,45.797 Q1.2@21.15,39.4 ; 21.474,27.857 ccw(c20.36,30.14) 22.9,30.14 22.9,37.65 ccw(c21.15,37.65) Q1.2@21.15,39.4 ; v1(27.6,81.6) 27.6,79.5 ; C106.1@30.2,76.2 27.6,76.2 ; 30.51,51.2 C22.2@30.51,48.3 30.51,44.229 cw(c29.656,44.229) 30.26,43.625 26.589,41.923 ; v1(32.5,81.4) cw(c29.813,81.4) 32.084,79.965 cw(c31.24,80.5) 31.242,79.5 27.6,79.5 ; Q1.2@21.15,39.4 26.589,41.923 ; 26.589,41.923 26.589,62.137 cw(c29.129,62.137) 27.315,63.914 27.316,63.916 ccw(c26.6,64.614) 27.6,64.612 27.6,76.2 ; 27.6,76.2 27.6,79.5
VBAT-: C11.1 C17.2 CP7.1 D1.1 Q2.2 U4.4 | length 42.9
  TOP w0.3: D1.1@18.9,85.05 19.35,84.9 v1(21.4,84.9) ; C11.1@23.15,86.05 C11.1@23.3,86.45
  TOP w0.4: v1(22.1,86.2) C11.1@22.85,86.2
  TOP w0.5: C11.1@23.3,86.45 U4.4@23.3,88.995
  BOT w1: Q2.2@16.2,79.7 19.39,79.7 cw(c19.39,78.79) CP7.1@20.3,78.79 cw(c21.61,78.79) 21.61,80.1 23.9,80.1 cw(c23.9,79.2) 24.8,79.2 24.8,64.24 cw(c22.26,64.24) 22.26,61.7 C17.2@20.334,61.7 ; CP7.1@20.3,79.048 cw(c22.84,79.048) 21.044,80.844 v1(22,81.8) ; 24.6,79.7 24.6,81.4 cw(c24.8,81.4) v1(24.8,81.6)
VBUS_SENSE: R12.2 R13.2 U12.68 | length 23.9
  TOP w0.3: U12.68@55.2,36 55.95,36 v1(57,36.1) ; v1(62.2,29.6) 64.55,27.25 R13.2@71.375,27.25 71.45,27.175 R12.2@71.45,23.675
  BOT w0.3: v1(57,36.1) v1(62.2,29.6)
pads on no net: J3. J3.A8 J3.B8 RF1.3 RF1.4 SW2.2 SW2.4 U12.1 U12.2 U12.3 U12.4 U12.5 U12.7 U12.8 U12.9 U12.15 U12.16 U12.17 U12.18 U12.23 U12.24 U12.25 U12.26 U12.31 U12.32 U12.33 U12.34 U12.36 U12.37 U12.38 U12.39 U12.40 U12.41 U12.42 U12.43 U12.44 U12.45 U12.46 U12.47 U12.48 U12.51 U12.52 U12.53 U12.54 U12.55 U12.56 U12.57 U12.58 U12.59 U12.60 U12.61 U12.62 U12.63 U12.64 U12.65 U12.66 U12.69 U12.77 U12.78 U12.79 U12.80 U12.89 U12.93 U12.95 U12.96 U12.97 U12.98

## Polygon pours and split planes (outlines as drawn)
3V3D on P "3V3D_L03_P023" (solid, pour order 23): 0.9,69 60.9,69 61,29 61,28.6 61,1 0.9,1
3V3A on P "3V3A_L03_P021" (solid, pour order 21): 1,98 98,98 98,1 62,1 62,70 1.015,70.002
GND on P "GND_L03_P018" (solid, pour order 18): 58,1 58,19 63,19 63,27 53,35.948 59.4,40 67,32 67,20.975 71,21 71,1
VBAT+ on P "VBAT+_L03_P020" (solid, pour order 20): 16,81 16,95 33,95 33,81
VBAT- on P "VBAT-_L03_P019" (solid, pour order 19): 20.951,90.016 21,82 21,81 26,81 26,90
GND on GND "GND_L02_P014" (solid, pour order 14): 0,99 0,0 99,0 99,99

## Silkscreen, mask and mechanical layers (free items; w line width, h text height)
Top Overlay:
  region: 88.942,19.533 89.569,19.038 89.8,19.005 90.097,18.873 90.493,19.005 90.922,19.005 91.153,18.939 91.45,18.774 91.813,18.411 92.11,17.982 92.242,17.685 92.275,17.223 92.605,16.563 92.935,15.342 93.1,14.055 93.1,12.9 93.166,12.273 93.1,11.844 93.199,10.458 92.869,10.788 92.836,10.755 92.902,10.326 92.671,10.821 92.44,10.953 92.407,10.722 92.209,11.217 92.11,11.217 92.011,10.755 92.011,10.227 92.242,9.666 92.374,9.501 92.374,9.402 92.242,9.369 92.11,9.567 92.044,9.534 92.044,8.973 92.11,8.775 92.11,8.511 92.209,8.28 92.242,7.818 92.341,7.587 92.407,7.059 92.473,6.993 92.77,7.059 93.298,7.29 93.694,7.257 93.496,7.026 93.529,6.96 93.43,6.861 92.77,6.696 92.671,6.597 92.671,5.904 93.133,4.947 93.232,4.848 96.598,4.848 96.598,4.716 75.511,4.716 75.511,4.848 82.672,4.848 82.738,4.914 82.804,5.442 83.002,6.036 83.035,7.092 83.167,7.752 83.068,7.851 82.705,7.884 82.045,8.082 81.55,8.577 81.385,8.874 81.352,9.27 81.253,9.534 81.253,9.765 81.418,10.293 81.814,10.557 82.243,10.689 82.309,10.755 82.309,11.085 82.342,10.821 82.408,10.755 82.771,10.821 83.299,10.788 83.563,10.557 83.629,10.425 83.761,9.864 83.761,9.402 84.025,9.072 84.322,9.039 85.213,8.775 86.368,8.346 87.028,9.072 87.028,9.765 87.226,9.93 87.523,9.93 87.754,9.831 87.853,9.93 88.117,10.623 87.985,11.217 87.853,11.349 87.886,11.679 87.754,11.778 87.82,12.537 87.391,12.966 87.259,13.23 87.061,13.296 86.962,13.395 87.193,13.791 87.193,14.088 86.962,14.253 86.929,14.088 86.599,14.352 86.467,14.352 86.203,14.616 86.137,14.616 86.071,15.078 85.939,15.243 85.84,15.21 85.972,15.54 86.038,16.233 86.17,16.662 86.533,17.223 87.028,17.718 87.556,18.048 87.721,18.213 87.556,18.774 87.556,19.137 87.655,19.401 87.886,19.566 88.381,19.731
  region: 96.843,20.175 75.756,20.175 75.756,20.34 96.843,20.34
  text "Pedram Rezaie" at 85.7,33.016 h1.52
  text "2026" at 85.599,30.916 h1.52
Bottom Overlay:
  text "BAT-" at 2.3,77.8 h1.52
  text "BAT+" at 2.2,64.9 h1.52
  text "BAT-" at 1.6,42.4 h1.52
  text "BAT+" at 1.7,31.2 h1.52
Mechanical 1:
  the board outline again, w0.254

## Text inside footprints (layer, text, board x,y; h text height)
J3: Mechanical 13 "PCB EDGE" at 59.87,0.575 h0.41